# Altium PCB x-fly_v0.11a.PcbDoc (part 1 of 2)
Units mil, origin at the board's own origin, x right, y up, seen from the top; angles counter-clockwise.
Board outline 1417.32 x 1417.32 mil, 4 copper layers (L1_TOP, L2_GND, L3_POWER, L4_BOTTOM), stack 21.665 mil thick; 122 components, 92 nets, 493 pads, 97 vias.
Unrouted connection lines stored in the file: 100.
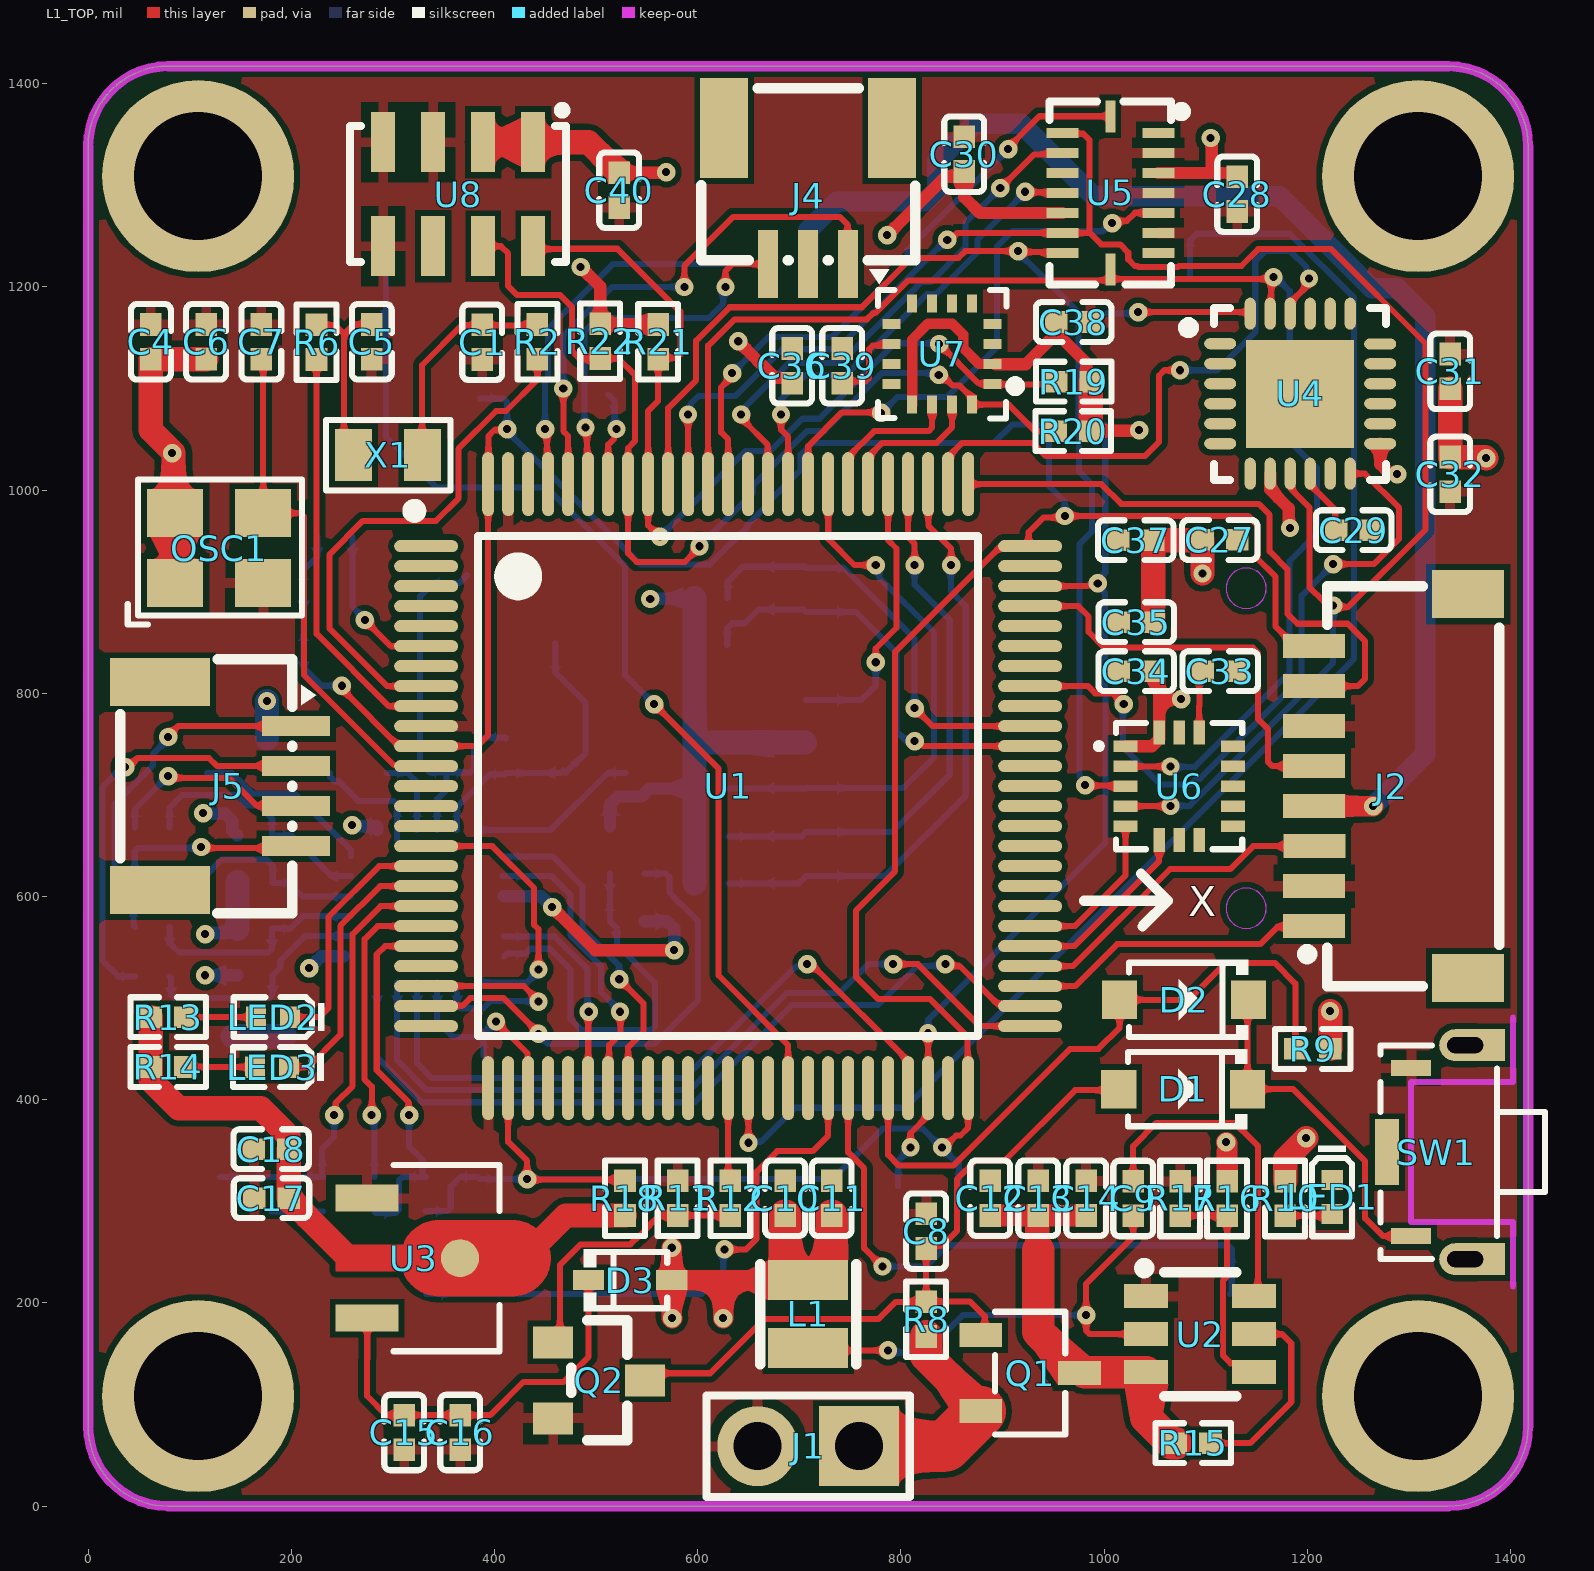
[diagram p0: L1_TOP view]
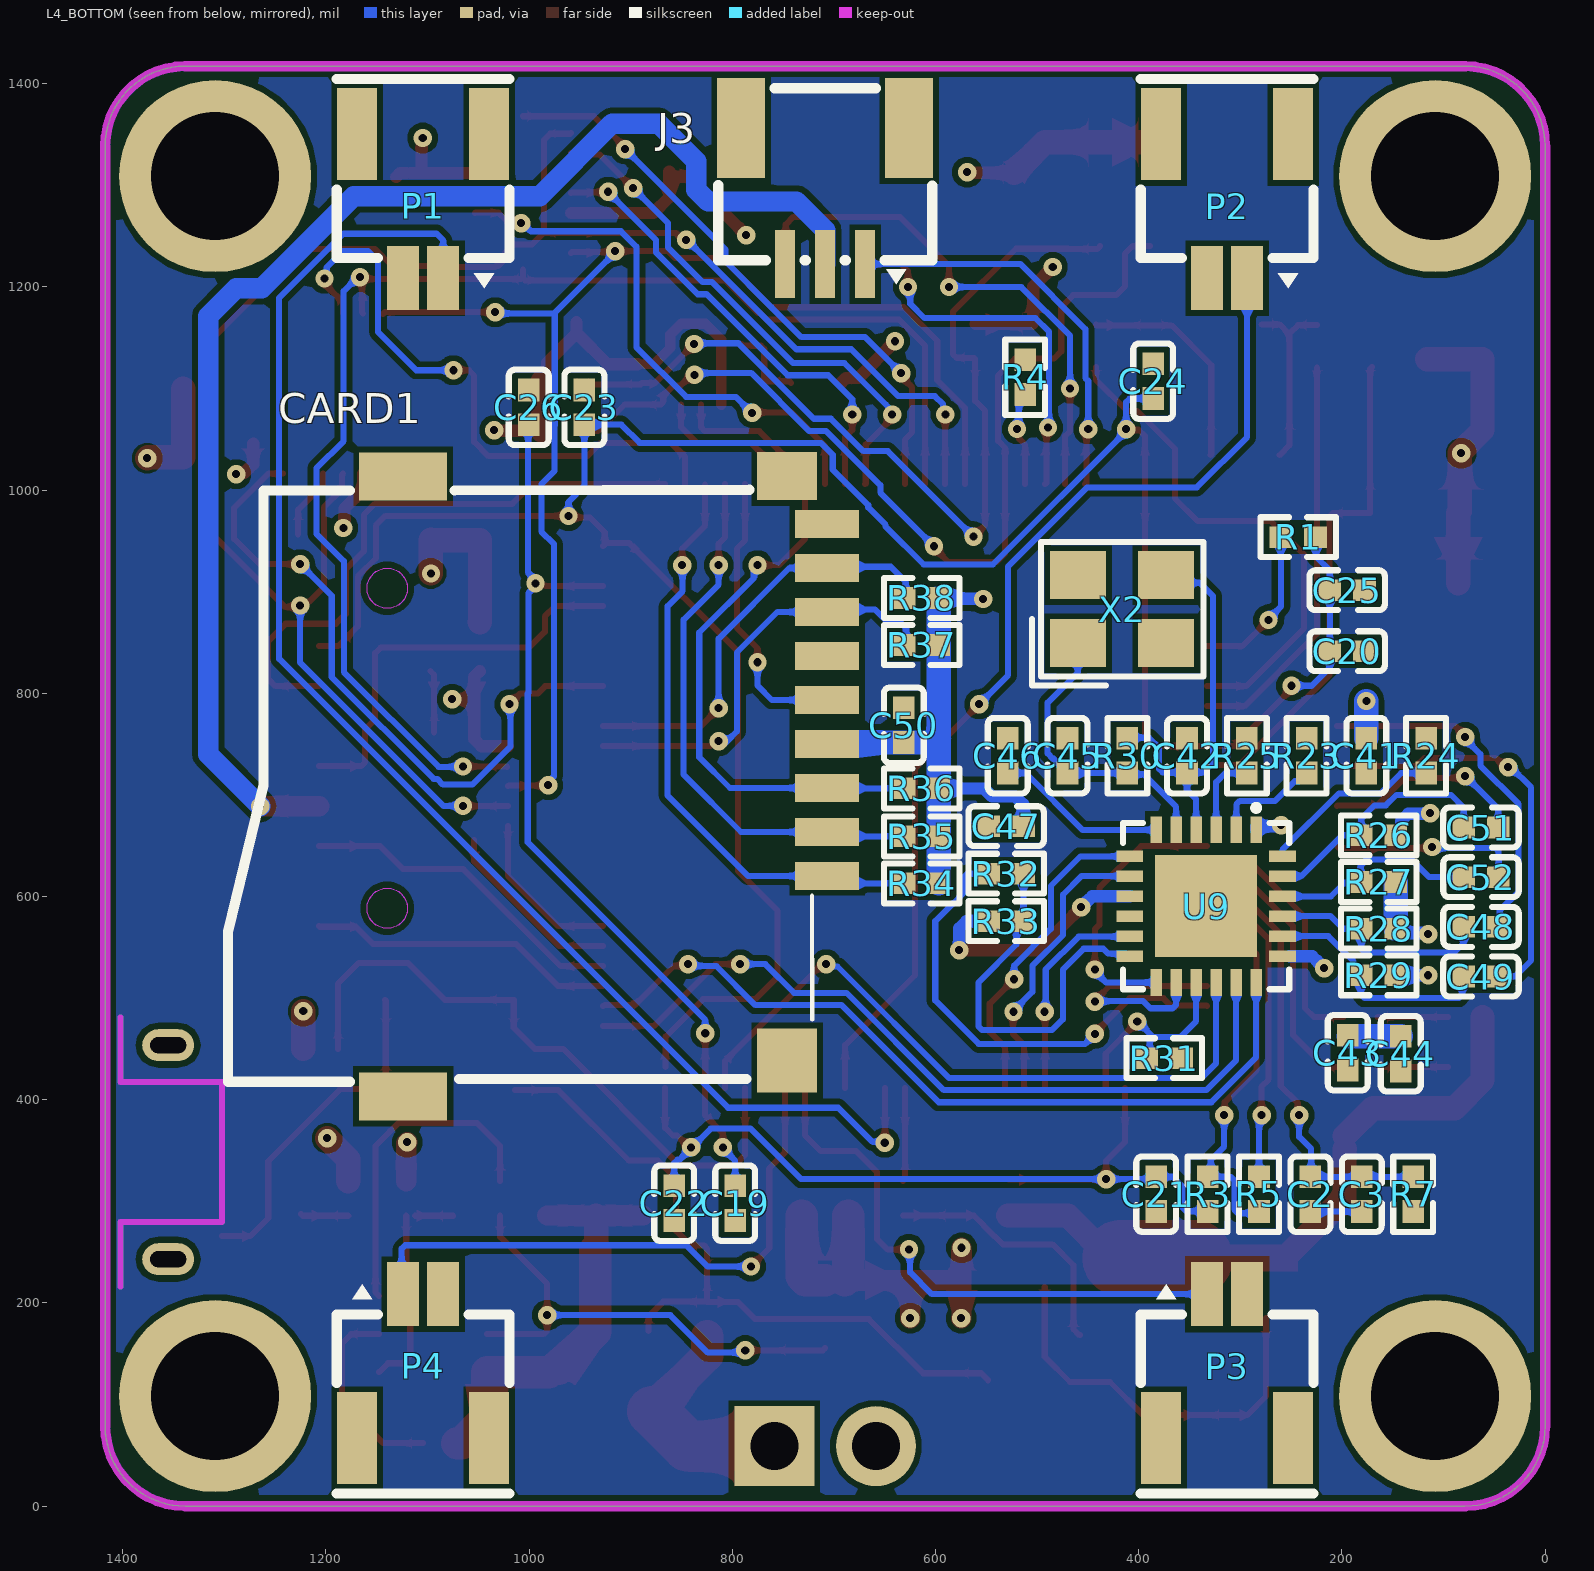
[diagram p1: L4_BOTTOM view, seen from below]
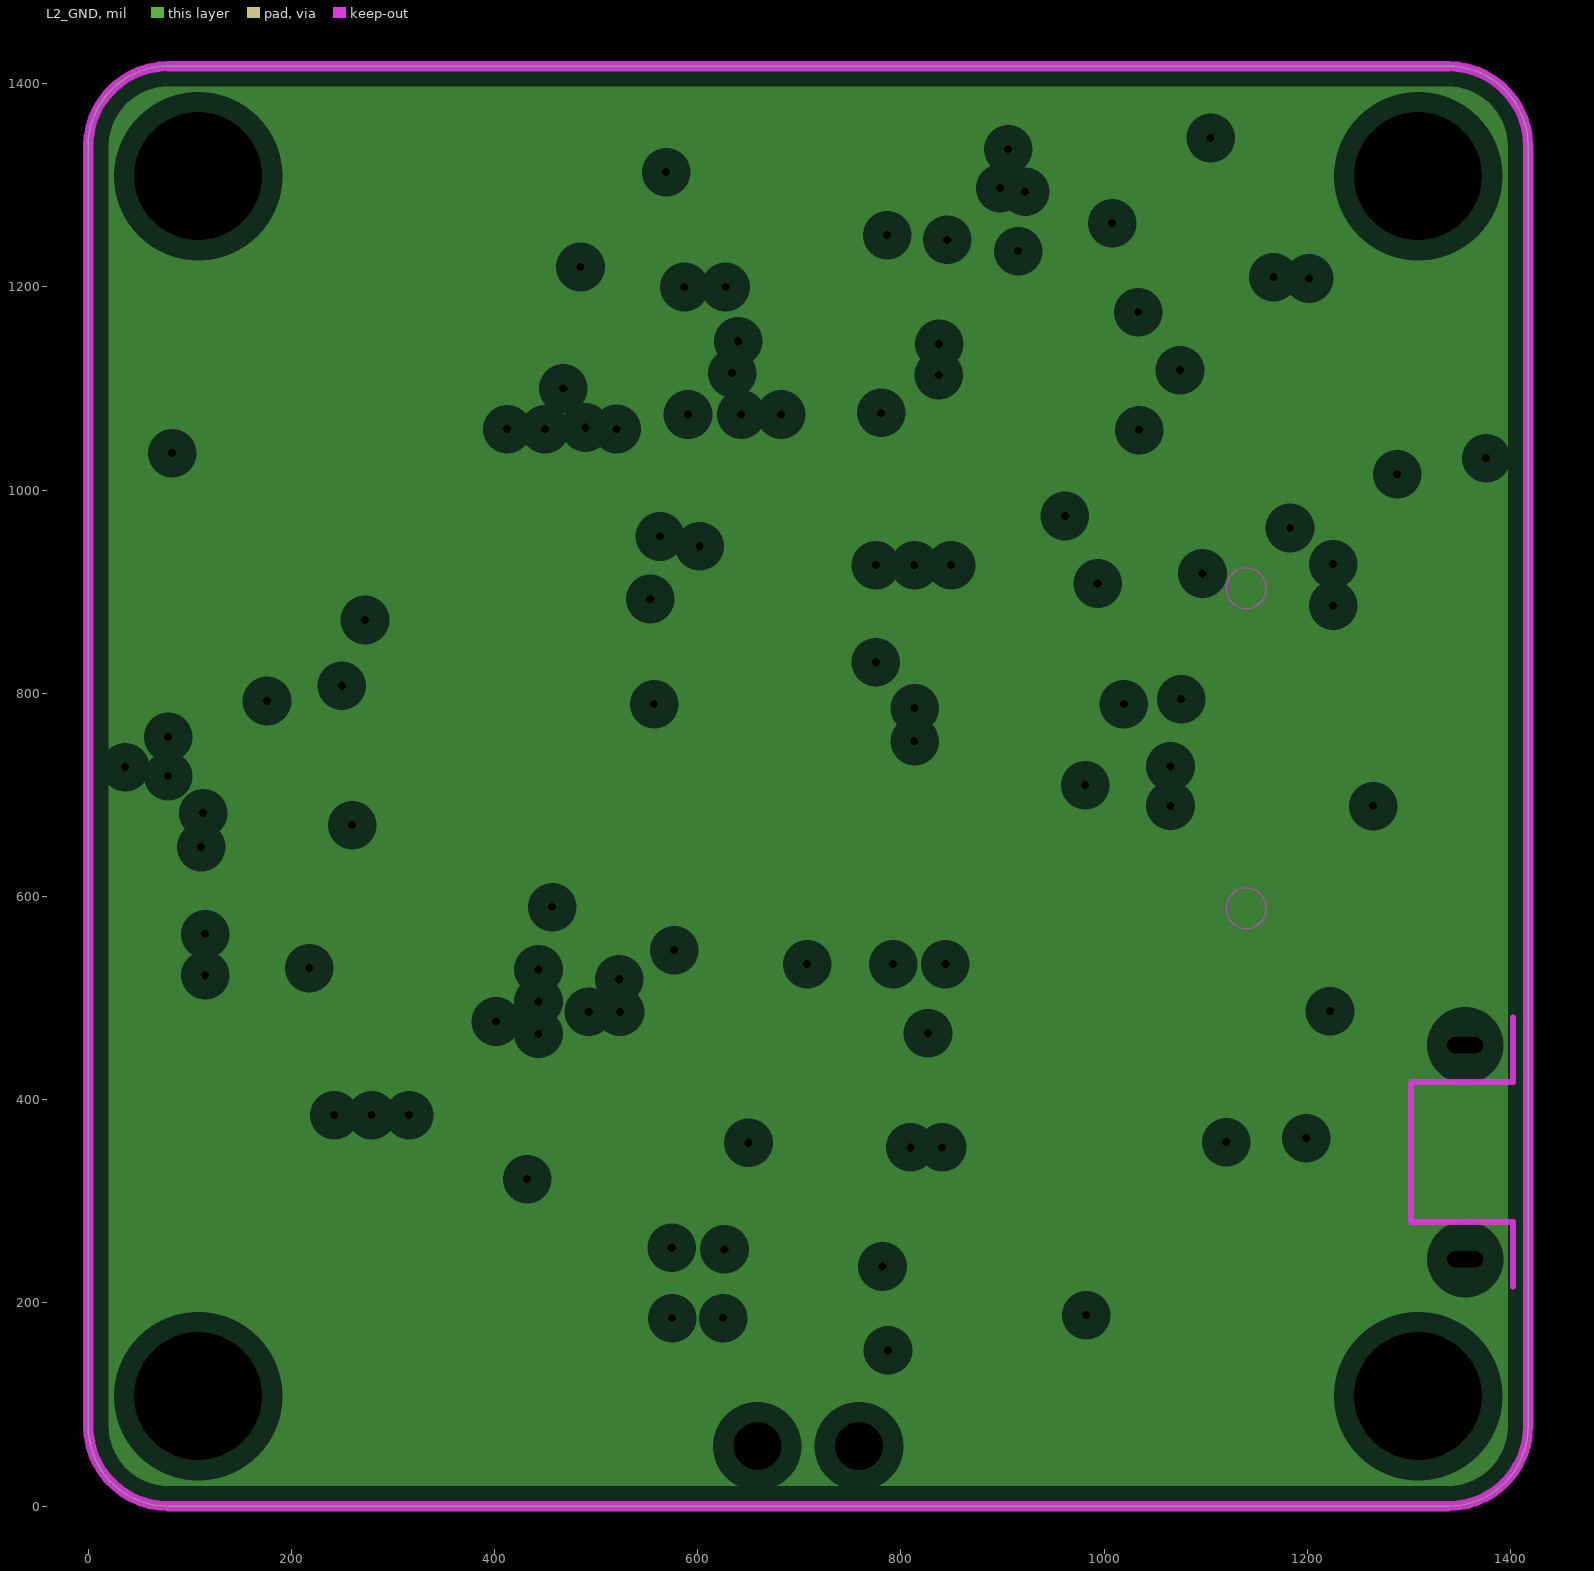
[diagram p2: L2_GND, clearances drawn from the general rule]
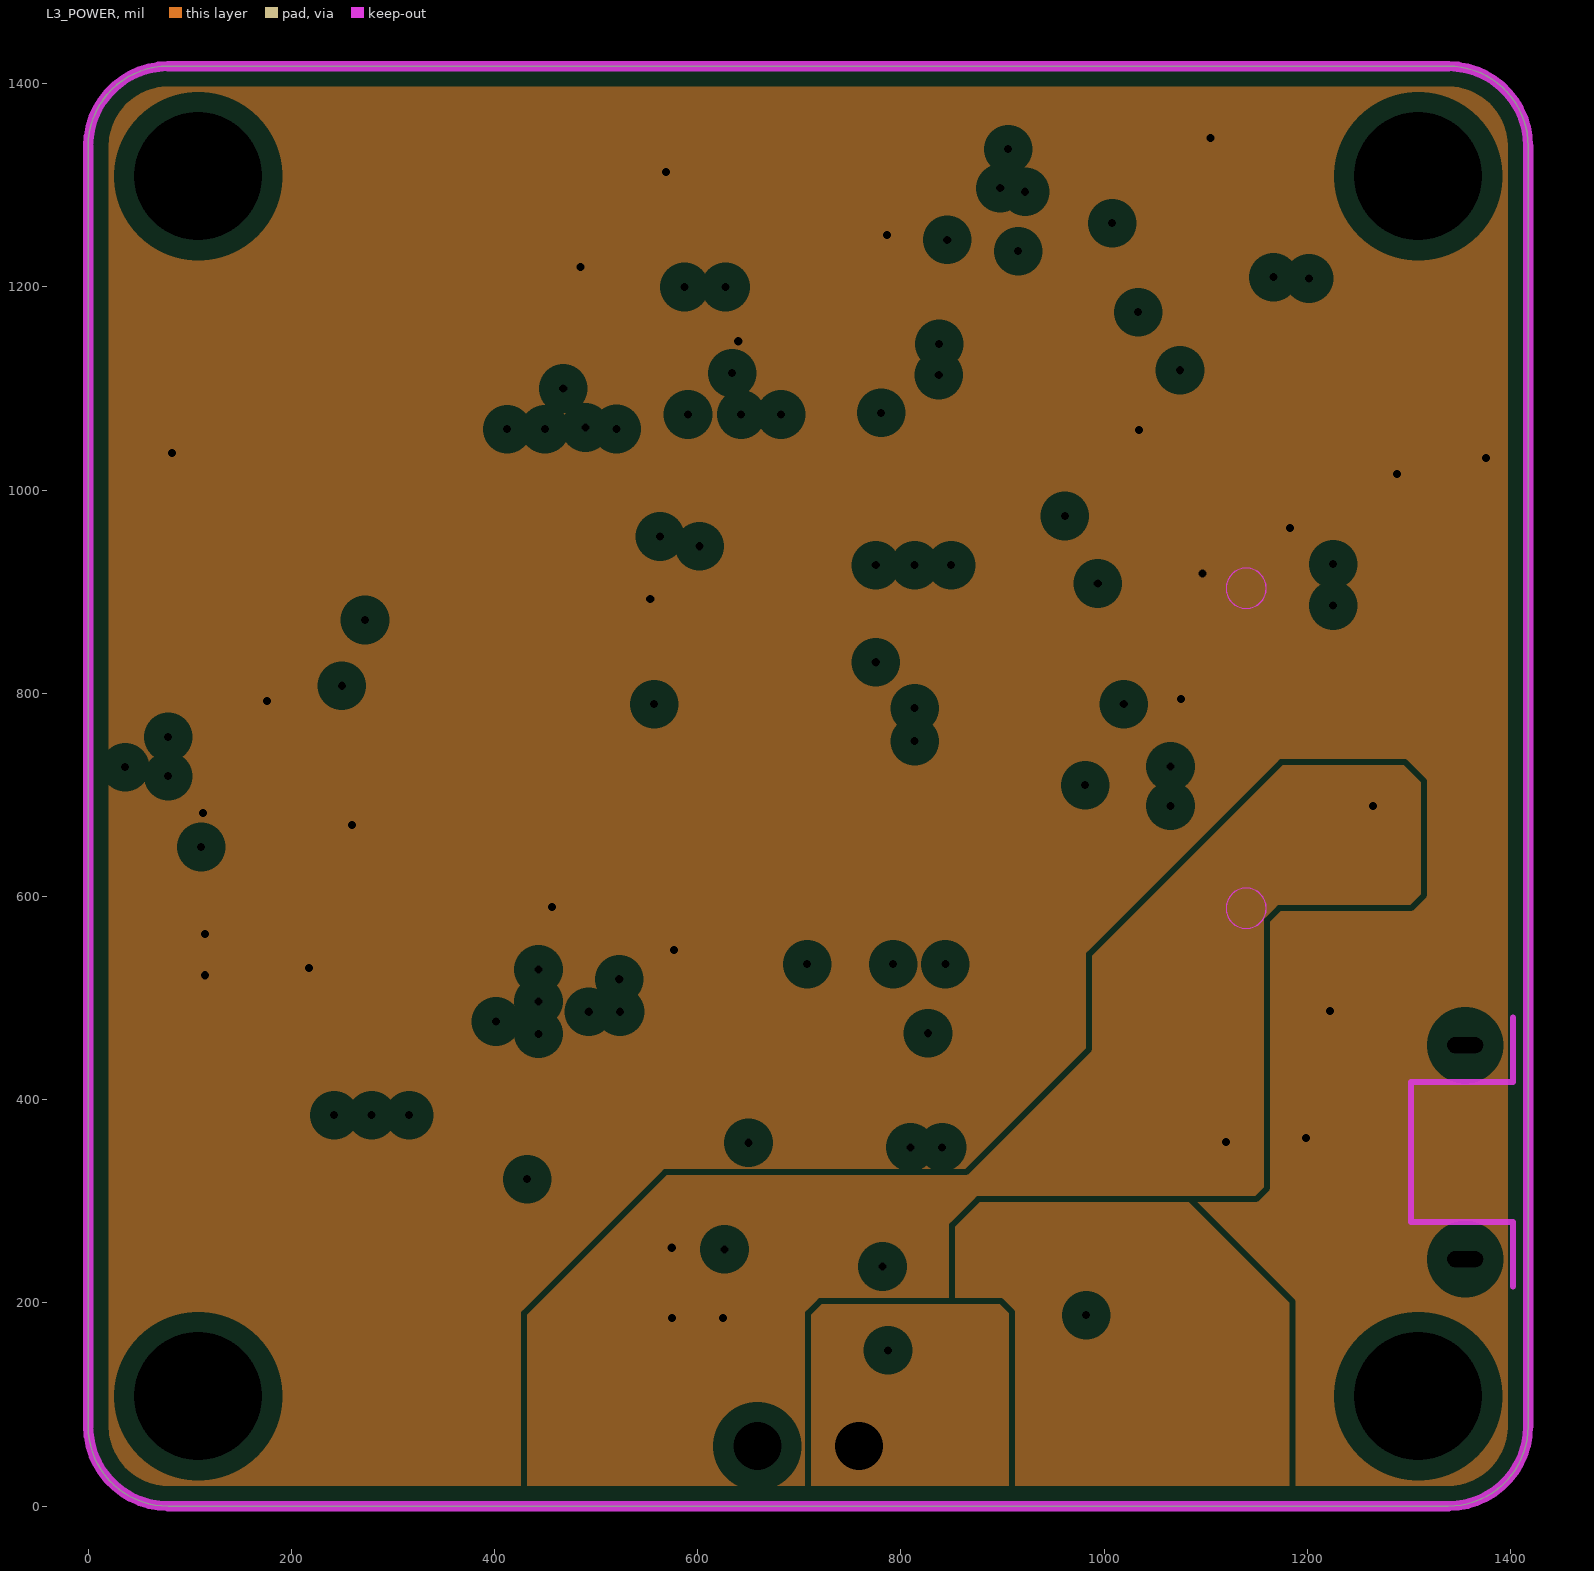
[diagram p3: L3_POWER, clearances drawn from the general rule]

## Layer stack, top to bottom
Top Solder: solder mask 0.4, Solder Resist, Dk 3.5
L1_TOP: signal copper 0.3543
Dielectric 2: prepreg 2.8, PP-006, Dk 4.1
L2_GND: plane copper 1.378
Dielectric 1: dielectric 12.6, FR-4, Dk 4.8
L3_POWER: plane copper 1.378, net 3V3
Dielectric 3: prepreg 2.8, PP-006, Dk 4.1
L4_BOTTOM: signal copper 0.3543
Bottom Solder: solder mask 0.4, Solder Resist, Dk 3.5

## Board outline
0,78.74 0,1338.58 cw(c78.74,1338.58) 78.74,1417.32 1338.58,1417.32 cw(c1338.58,1338.58) 1417.32,1338.58 1417.32,78.74 cw(c1338.58,78.74) 1338.58,0 78.74,0 cw(c78.74,78.74)

## Design rules (kind name [scope] priority, off if disabled: settings)
Clearance [All] p1: gap=5.91 ignorepadtopadclearanceinfootprint=TRUE
HoleSize HoleSize_1 [IsPad] p1: absolutevalues=TRUE maxlimit=141.73 minlimit=1 maxpercent=80.000 minpercent=20.000
HoleSize [All] p2: absolutevalues=TRUE maxlimit=100 minlimit=1 maxpercent=80.000 minpercent=20.000
MinimumSolderMaskSliver MaskSliver_DenseFoot [InComponent('CARD1') Or InComponent('U4') Or InComponent('U5') Or InComponent('U6') Or InComponent('U7')] p1: minsoldermaskwidth=0
MinimumSolderMaskSliver [All] p2: minsoldermaskwidth=3.94
PlaneClearance [All] p1: clearance=20
PlaneConnect [All] p1: planeconnectstyle=Relief reliefexpansion=20 reliefentries=4 reliefconductorwidth=10 reliefairgap=10
PolygonConnect [All] p1: connectstyle=Relief reliefconductorwidth=10 reliefentries=4 polygonreliefangle="90 Angle" airgapwidth=10
RoutingVias [All] p1: holewidth=11.81 width=23.62 viastyle="Through Hole" minholewidth=11.81 minwidth=23.62 maxholewidth=11.81 maxwidth=23.62
SilkToSolderMaskClearance SilkToSolderMaskClearance_1 [InComponent('J3') Or InComponent('J4') Or InComponent('J5')] p1: minsilkscreentomaskgap=0 clearancetoexposedcopper=TRUE
SilkToSolderMaskClearance [IsPad] p2: minsilkscreentomaskgap=1.97 clearancetoexposedcopper=TRUE
SolderMaskExpansion [All] p1: expansion=4 istentingtop=FALSE
SupplyNets "Schematic Supply Nets_2" [InNet('+BAT_3S')] p1: voltage=0.000
SupplyNets "Schematic Supply Nets_1" [InNet('GND')] p2: voltage=0.000
SupplyNets "Schematic Supply Nets" [InNet('VDD_MCU')] p3: voltage=0.000
UnRoutedNet [InNet('No Net')] p1:
Width 12V [InNetClass('12V')] p1: maxlimit=60 minlimit=20 preferedwidth=50 minimp=50.000000 maximp=50.000000 favimp=50.000000
Width 5V [InNetClass('5V')] p2: maxlimit=40 minlimit=20 preferedwidth=32 minimp=50.000000 maximp=50.000000 favimp=50.000000
Width 3.3V [InNetClass('3.3V')] p3: maxlimit=32 minlimit=10 preferedwidth=24 minimp=50.000000 maximp=50.000000 favimp=50.000000
Width [All] p4: maxlimit=10 minlimit=6 preferedwidth=6 minimp=50.000000 maximp=50.000000 favimp=50.000000
24 further rules are at their usual default settings.

## Classes and differential pairs
net class 12V: +BAT_3S VSYS
net class 5V: 5V
net class 3.3V: 3V3
component class Sheet3: C41 C42 C43 C44 C45 C46 C47 C48 C49 C50 C51 C52 CARD1 J5 R23 R24 R25 R26 R27 R28 R29 R30 R31 R32 R33 R34 R35 R36 R37 R38 U9 X2
component class Sheet2: C27 C28 C29 C30 C31 C32 C33 C34 C35 C36 C37 C38 C39 C40 R19 R20 R21 R22 U4 U5 U6 U7 U8
component class Sheet1: C1 C2 C3 C4 C5 C6 C7 C8 C9 C10 C11 C12 C13 C14 C15 C16 C17 C18 C19 C20 C21 C22 C23 C24 C25 C26 D1 D2 D3 J1 J2 J3 J4 L1 LED1 LED2 LED3 OSC1 P1 P2 P3 P4 Q1 Q2 R1 R2 R3 R4 R5 R6 R7 R8 R9 R10 R11 R12 R13 R14 R15 R16 R17 R18 SW1 U1 U2 U3 X1

## Components (designator, comment, footprint, x,y, rotation, side; value= is the part's Value field where it differs from the comment)
C1 "0402-Cap-5.1pF" 0402-Cap 387.84,1145.67 r90 top
C2 "0402-Cap-100nF" 0402-Cap 231.11,307.09 r270 bottom
C3 "0402-Cap-10uF" 0402-Cap 180.52,307.09 r270 bottom
C4 "0402-Cap-100nF" 0402-Cap 61.71,1146.07 r270 top
C5 "0402-Cap-5.1pF" 0402-Cap 279.13,1146.07 r90 top
C6 "0402-Cap-10uF" 0402-Cap 116.07,1146.07 r270 top
C7 "0402-Cap-15pF" 0402-Cap 170.42,1146.07 r270 top
C8 "0402-Cap-4.7uF" 0402-Cap 824.79,270.67 r270 top
C9 "0402-Cap-0.1uF" 0402-Cap 1028.54,302.87 r270 top
C10 "0402-Cap-22uF" 0402-Cap 685.93,303.13 r90 top
C11 "0402-Cap-22uF" 0402-Cap 731.79,303.13 r90 top
C12 "0402-Cap-10uF" 0402-Cap 887.8,303.15 r270 top
C13 "0402-Cap-10uF" 0402-Cap 935.04,303.15 r270 top
C14 "0402-Cap-0.1uF" 0402-Cap 982.28,303.15 r270 top
C15 "0402-Cap-22uF" 0402-Cap 311.02,72.55 r270 top
C16 "0402-Cap-100nF" 0402-Cap 366.14,72.55 r270 top
C17 "0402-Cap-100nF" 0402-Cap 180.44,303.15 r180 top
C18 "0402-Cap-22uF" 0402-Cap 180.12,351.38 r180 top
C19 "0402-Cap-2.2uF" 0402-Cap 797.24,298.23 r90 bottom locked
C20 "0402-Cap-4.7uF" 0402-Cap 194.88,841.54 r0 bottom locked
C21 "0402-Cap-100nF" 0402-Cap 382.87,307.09 r90 bottom
C22 "0402-Cap-100nF" 0402-Cap 857.28,298.23 r90 bottom locked
C23 "0402-Cap-100nF" 0402-Cap 945.64,1081.5 r270 bottom locked
C24 "0402-Cap-100nF" 0402-Cap 385.83,1107.28 r270 bottom
C25 "0402-Cap-100nF" 0402-Cap 194.88,901.57 r0 bottom locked
C26 "0402-Cap-2.2uF" 0402-Cap 1000.42,1081.5 r270 bottom locked
C27 "0402-Cap-10nF" 0402-Cap 1113.76,951.05 r0 top
C28 "0402-Cap-100nF" 0402-Cap 1130.91,1291.34 r90 top
C29 "0402-Cap-0.47uF" 0402-Cap 1245.47,960.63 r0 top
C30 "0402-Cap-100nF" 0402-Cap 862.2,1330.71 r270 top
C31 "0402-Cap-2.2uF" 0402-Cap 1340.55,1116.93 r270 top
C32 "0402-Cap-0.1uF" 0402-Cap 1340.55,1015.55 r90 top
C33 "0402-Cap-0.1uF" 0402-Cap 1114.17,821.85 r0 top
C34 "0402-Cap-0.1uF" 0402-Cap 1031.5,821.85 r0 top
C35 "0402-Cap-2.2uF" 0402-Cap 1031.5,870.08 r0 top
C36 "0402-Cap-0.1uF" 0402-Cap 692.91,1122.44 r270 top
C37 "0402-Cap-10nF" 0402-Cap 1030.98,950.79 r0 top
C38 "0402-Cap-0.1uF" 0402-Cap 969.87,1165.51 r0 top
C39 "0402-Cap-4.7uF" 0402-Cap 742.13,1122.44 r90 top
C40 "0402-Cap-0.1uF" 0402-Cap 522.64,1295.28 r270 top
C41 "0402-Cap-0.1uF" 0402-Cap 176.03,738.67 r270 bottom
C42 "0402-Cap-18pF" 0402-Cap 352.5,738.67 r90 bottom
C43 "0402-Cap-0.1uF" 0402-Cap 194.32,446.33 r270 bottom locked
C44 "0402-Cap-0.1uF" 0402-Cap 142.16,445.35 r90 bottom locked
C45 "0402-Cap-18pF" 0402-Cap 470.14,738.67 r270 bottom
C46 "0402-Cap-10uF" 0402-Cap 528.97,738.67 r90 bottom
C47 "0402-Cap-0.1uF" 0402-Cap 530.51,669.29 r0 bottom
C48 "0402-Cap-0.1uF" 0402-Cap 63.19,570.21 r0 bottom
C49 "0402-Cap-0.1uF" 0402-Cap 63.19,521.33 r0 bottom
C50 "0402-Cap-0.1uF" 0402-Cap 631.31,768.67 r270 bottom
C51 "0402-Cap-0.1uF" 0402-Cap 63.19,667.98 r0 bottom
C52 "0402-Cap-0.1uF" 0402-Cap 63.19,619.09 r0 bottom
CARD1 "TF" TF 915.35,708.66 r270 bottom locked
D1 "1N4148W" 1N4148W 1077.76,410.43 r0 top
D2 "1N4148W" 1N4148W 1078.58,498.39 r0 top
D3 "B5819WS" B5819WS 533.46,222.44 r180 top
J1 "XH2.50_2PIN-CZ" XH2.50_2PIN-CZ 708.66,59.06 r180 top locked
J2 "PM1.00-1-8PY" PM1.00-1-8PY 1282.48,708.66 r90 top locked
J3 "zx-sh1.0-3pwt" PM1.00-1-3PY 708.66,1289.37 r0 bottom locked
J4 "zx-sh1.0-3pwt" PM1.00-1-3PY 708.66,1289.37 r180 top locked
J5 "PM1.00-1-4PY" PM1.00-1-4PY 137.8,708.66 r270 top locked
L1 "2512-IND-3.3uH" 2512-IND 708.66,188.98 r270 top value=3.3uH
LED1 "LED-0402-BLUE" LED-0402-BLUE 1224.41,304.13 r270 top
LED2 "LED-0402-GREEN" LED-0402-GREEN 181.72,481.3 r180 top
LED3 "LED-0402-RED" LED-0402-RED 181.1,432.09 r180 top
OSC1 "HS_25M hz" YXC_HS_25M_3225 128.94,942.91 r0 top
P1 "PM1.00-1-2PY" PM1.00-1-2PY 1104.33,1279.53 r0 bottom locked
P2 "PM1.00-1-2PY" PM1.00-1-2PY 312.99,1279.53 r0 bottom locked
P3 "PM1.00-1-2PY" PM1.00-1-2PY 312.99,137.8 r180 bottom locked
P4 "PM1.00-1-2PY" PM1.00-1-2PY 1104.33,137.8 r180 bottom locked
Q1 "BLM3401" BLM3401 927.17,130.91 r180 top locked
Q2 "2N7002" 2N7002 502.95,123.91 r180 top
R1 "0402-Res-0Ω" 0402-Res 243.11,953.74 r0 bottom locked
R2 "0402-Res-0Ω" 0402-Res 442.18,1146.06 r270 top
R3 "0402-Res-0Ω" 0402-Res 332.27,307.08 r90 bottom
R4 "0402-Res-0Ω" 0402-Res 511.81,1111.22 r90 bottom locked
R5 "0402-Res-0Ω" 0402-Res 281.68,307.08 r270 bottom
R6 "0402-Res-0Ω" 0402-Res 224.76,1145.67 r270 top
R7 "0402-Res-0Ω" 0402-Res 129.92,307.08 r90 bottom
R8 "0402-Res-47kΩ" 0402-Res 824.8,184.06 r270 top
R9 "0402-Res-10kΩ" 0402-Res 1205.3,450.06 r0 top
R10 "0402-Res-270Ω" 0402-Res 1178.06,302.86 r270 top
R11 "0402-Res-10kΩ" 0402-Res 580.2,303.14 r270 top
R12 "0402-Res-10kΩ" 0402-Res 632.06,303.14 r270 top
R13 "0402-Res-510Ω" 0402-Res 78.74,481.3 r0 top
R14 "0402-Res-510Ω" 0402-Res 78.74,432.22 r0 top
R15 "0402-Res-10kΩ" 0402-Res 1087.6,62.01 r180 top
R16 "0402-Res-54.9kΩ" 0402-Res 1121.02,302.86 r270 top
R17 "0402-Res-10kΩ" 0402-Res 1074.8,302.86 r270 top
R18 "0402-Res-0Ω" 0402-Res 528.35,303.14 r270 top
R19 "0402-Res-4.7KΩ" 0402-Res 969.88,1106.78 r0 top
R20 "0402-Res-4.7KΩ" 0402-Res 969.49,1058.07 r0 top
R21 "0402-Res-10KΩ" 0402-Res 561.02,1146.06 r90 top locked
R22 "0402-Res-10KΩ" 0402-Res 503.94,1146.65 r270 top
R23 "0402-Res-10kΩ" 0402-Res 234.83,738.68 r90 bottom
R24 "0402-Res-12.1kΩ" 0402-Res 117.19,738.68 r270 bottom
R25 "0402-Res-10kΩ" 0402-Res 293.66,738.68 r90 bottom
R26 "0402-Res-49.9Ω" 0402-Res 163.98,660.3 r0 bottom locked
R27 "0402-Res-49.9Ω" 0402-Res 163.98,614.37 r0 bottom locked
R28 "0402-Res-49.9Ω" 0402-Res 163.98,568.44 r0 bottom locked
R29 "0402-Res-49.9Ω" 0402-Res 163.98,522.51 r0 bottom locked
R30 "0402-Res-1MΩ" 0402-Res 411.31,738.68 r90 bottom
R31 "0402-Res-10kΩ" 0402-Res 375,440.94 r0 bottom
R32 "0402-Res-33Ω" 0402-Res 530.5,622.53 r0 bottom
R33 "0402-Res-1.5kΩ" 0402-Res 530.51,575.79 r0 bottom
R34 "0402-Res-47kΩ" 0402-Res 613.78,612.99 r180 bottom locked
R35 "0402-Res-47kΩ" 0402-Res 613.78,659.25 r180 bottom locked
R36 "0402-Res-47kΩ" 0402-Res 613.78,706.5 r180 bottom
R37 "0402-Res-47kΩ" 0402-Res 613.78,847.64 r180 bottom
R38 "0402-Res-47kΩ" 0402-Res 613.78,893.9 r180 bottom
SW1 "BUTTON-MINI" button-mini 1326.77,348.43 r270 top locked
U1 "STM32H743VIT6" STM32H743VIT6 629.92,708.66 r270 top locked
U2 "TPS563201DDCR" TPS563201DDCR 1094.49,169.29 r180 top locked
U3 "AMS1117-SOT-89" AMS1117-SOT-89 328,244.1 r180 top locked
U4 "ICM-20689" ICM-20689 1192.92,1094.98 r0 top locked
U5 "BMI088" BMI088 1006.89,1289.37 r180 top locked
U6 "ICM-20602" ICM-20602 1073.82,708.66 r270 top locked
U7 "IST8310" IST8310 840.55,1133.86 r90 top locked
U8 "MS5611" MS5611 364.17,1291.34 r180 top
U9 "LAN8720A" LAN8720A 333.66,590.55 r0 bottom
X1 "32.768k hz" 32.768KHZ_2012 295.28,1034.45 r0 top
X2 "YXC_NS_25M_3225" YXC_NS_25M_3225 416.34,882.87 r180 bottom locked

## Footprints (in the part's own frame and the unit in brackets; to place one, negate y for a bottom-side part, rotate by r counter-clockwise, add the part's x,y. Pads: shape width x height; smd on the part's side, far side on the other; paste and mask are expansions set on the pad)
1N4148W [mm] "SOD-123_L2.7-W1.6-LS3.7-FD"
  rect 0.88x0.96 smd: 1(-1.61,0) 2(1.61,0)
  silkscreen extent -1.38,-1 1.6,1
2N7002 [mm] "SOT-23_L2.9-W1.3-P1.90-LS2.4-BR"
  rect 1x0.8 smd: 1(1.15,-0.95) 2(1.15,0.95) 3(-1.15,0)
  silkscreen extent -0.7,-1.5 0.7,1.5
32.768KHZ_2012 [mm] "FC-12M_L2.0-W1.2"
  rect 0.925x1.3 smd paste+0.051: 1(-0.863,0) 2(0.863,0)
  silkscreen extent -1.55,-0.88 1.55,0.88
0402-Cap [mm]
  rect 0.566x0.54 smd paste-100 mask+0.051: 1(-0.433,0) 2(0.433,0)
  silkscreen extent -0.94,-0.5 0.94,0.5
0402-Res [mm]
  rect 0.566x0.54 smd paste-100 mask+0.051: 1(-0.433,0) 2(0.433,0)
  silkscreen extent -0.94,-0.5 0.94,0.5
2512-IND [mm] "IND-SMD_L2.5-W2.0_YHNR2512"
  rect 1x2 smd: 1(-0.85,0) 2(0.85,0)
  silkscreen extent -1.25,-1.2 1.25,1.2
AMS1117-SOT-89 [mm] "SOT-89-3_L4.5-W2.5-P1.50-LS4.2-BR"
  rect 1.575x0.672 smd paste+0 mask+0.051: 1(1.356,-1.5) 3(1.356,1.5)
  round 0.95 smd: 2(-0.966,0)
  L1_TOP region: -2.283,0.95 -0.429,0.95 -0.384,0.949 -0.34,0.946 -0.296,0.94 -0.252,0.933 -0.208,0.924 -0.165,0.912 -0.123,0.899 -0.081,0.884 -0.04,0.866 0,0.847 0.04,0.826 0.078,0.803 0.115,0.779 0.151,0.752 0.185,0.724 0.219,0.695 0.251,0.664 0.281,0.631 0.31,0.597 0.337,0.562 0.362,0.525 0.386,0.488 0.408,0.449 0.428,0.409 0.447,0.33 2.144,0.33 2.144,-0.33 0.447,-0.33 0.428,-0.409 0.408,-0.449 0.386,-0.488 0.362,-0.526 0.337,-0.562 0.31,-0.597 0.281,-0.631 0.251,-0.664 0.219,-0.695 0.185,-0.725 0.151,-0.753 0.115,-0.779 0.078,-0.804 0.04,-0.827 0,-0.848 -0.04,-0.867 -0.081,-0.884 -0.123,-0.899 -0.165,-0.913 -0.208,-0.924 -0.252,-0.934 -0.296,-0.941 -0.34,-0.946 -0.384,-0.949 -0.429,-0.95 -2.283,-0.95 -2.328,-0.949 -2.372,-0.946 -2.416,-0.941 -2.46,-0.934 -2.504,-0.924 -2.547,-0.913 -2.589,-0.899 -2.631,-0.884 -2.672,-0.867 -2.713,-0.848 -2.752,-0.827 -2.79,-0.804 -2.827,-0.779 -2.863,-0.753 -2.898,-0.725 -2.931,-0.695 -2.963,-0.664 -2.993,-0.631 -3.022,-0.597 -3.049,-0.562 -3.075,-0.526 -3.098,-0.488 -3.12,-0.449 -3.141,-0.409 -3.159,-0.369 -3.175,-0.327 -3.189,-0.285 -3.202,-0.242 -3.212,-0.199 -3.22,-0.155 -3.227,-0.111 -3.231,-0.067 -3.233,-0.022 -3.233,0.022 -3.231,0.067 -3.227,0.111 -3.22,0.155 -3.212,0.199 -3.202,0.242 -3.189,0.285 -3.175,0.327 -3.159,0.369 -3.141,0.409 -3.12,0.449 -3.098,0.488 -3.075,0.525 -3.049,0.562 -3.022,0.597 -2.993,0.631 -2.963,0.664 -2.931,0.695 -2.898,0.724 -2.863,0.752 -2.827,0.779 -2.79,0.803 -2.752,0.826 -2.713,0.847 -2.672,0.866 -2.631,0.884 -2.589,0.899 -2.547,0.912 -2.504,0.924 -2.46,0.933 -2.416,0.94 -2.372,0.946 -2.328,0.949 -2.283,0.95
  silkscreen extent -1.95,-2.33 0.7,2.33
B5819WS [mm] "SOD-323_L1.7-W1.3-LS2.5-FD"
  rect 0.78x0.5 smd: 1(-1.04,0) 2(1.04,0)
  silkscreen extent -0.93,-0.78 1.15,0.78
BLM3401 [mm] "SOT-23-3_L2.9-W1.6-P1.90-LS2.8-BR"
  rect 1.07x0.6 smd paste+0 mask+0.051: 1(1.235,-0.95) 2(1.235,0.95) 3(-1.235,0)
  silkscreen extent -0.88,-1.54 0.88,1.54
BMI088 [mm]
  rect 0.8x0.25 smd paste+0.051: 1(-1.177,-1.581) 2(-1.177,-1.081) 3(-1.177,-0.581) 4(-1.177,-0.081) 5(-1.177,0.419) 6(-1.177,0.919) 7(-1.177,1.419) 9(1.223,1.419) 10(1.223,0.919) 11(1.223,0.419) 12(1.223,-0.081) 13(1.223,-0.581) 14(1.223,-1.081) 15(1.223,-1.581)
  rect 0.25x0.8 smd paste+0.051: 8(0.023,1.832) 16(0.023,-1.998)
  silkscreen extent -1.87,-2.37 1.55,2.2
button-mini [mm]
  rect 0.4x1 smd paste-100 mask+0.051: 1(-2.1,-0.625) 2(2.1,-0.625)
  rect 1.65x0.6 smd paste-100 mask+0.051: 3(0,-1.225)
  oval 0.8x1.3 hole 0.4 slot 0.9 at 90 deg: 4(-2.675,0.725) 4(2.675,0.725)
  rect 0.8x1 smd paste-100 mask+0.051: 4(-2.675,1.225) 4(2.675,1.225)
  Keep-Out Layer lines w0.15: 3.361,1.915 1.75,1.915 1.75,1.143 1.75,-0.625 -1.75,-0.625 -1.75,1.143 -1.75,1.788 -1.75,1.915 -3.37,1.915
  silkscreen extent -2.67,-1.4 2.67,2.73
ICM-20602 [mm] "LGA-16_L3.0-W3.0-P0.50-BL"
  rect 0.28x0.6 smd paste+0.051: 1(-1,-1.343) 2(-0.5,-1.343) 3(0,-1.343) 4(0.5,-1.343) 5(1,-1.343) 9(1,1.343) 10(0.5,1.343) 11(0,1.343) 12(-0.5,1.343) 13(-1,1.343)
  rect 0.6x0.28 smd paste+0.051: 6(1.343,-0.5) 7(1.343,0) 8(1.343,0.5) 14(-1.343,0.5) 15(-1.343,0) 16(-1.343,-0.5)
  silkscreen extent -1.58,-2.08 1.58,1.58
ICM-20689 [mm] "QFN-24_L4.0-W4.0-P0.50-TL-EP2.6"
  oval 0.8x0.28 smd paste-100 mask+0.051: 1(-2,1.25) 2(-2,0.75) 3(-2,0.25) 4(-2,-0.25) 5(-2,-0.75) 6(-2,-1.25) 13(2,-1.25) 14(2,-0.75) 15(2,-0.25) 16(2,0.25) 17(2,0.75) 18(2,1.242)
  oval 0.28x0.8 smd paste-100 mask+0.051: 7(-1.25,-2) 8(-0.75,-2) 9(-0.25,-2) 10(0.25,-2) 11(0.75,-2) 12(1.25,-2) 19(1.25,2) 20(0.75,2) 21(0.25,2) 22(-0.25,2) 23(-0.75,2) 24(-1.25,2)
  rect 2.7x2.7 smd paste-100 mask+0.051: 25(0,-0.013)
  silkscreen extent -3.05,-2.16 2.15,2.14
IST8310 [mm] "LGA-16_L3.0-W3.0-P0.50-BL_SQ"
  rect 0.25x0.45 smd paste+0.051: 1(-0.75,-1.263) 2(-0.25,-1.263) 3(0.25,-1.263) 4(0.75,-1.263) 9(0.75,1.263) 10(0.25,1.263) 11(-0.25,1.263) 12(-0.75,1.263)
  rect 0.45x0.25 smd paste+0.051: 5(1.263,-0.75) 6(1.263,-0.25) 7(1.263,0.25) 8(1.263,0.75) 13(-1.263,0.75) 14(-1.263,0.25) 15(-1.263,-0.25) 16(-1.263,-0.75)
  silkscreen extent -1.61,-1.95 1.61,1.6
LAN8720A [mm] "QFN-24_L4.0-W4.0-P0.50-BL-EP2.6"
  rect 0.28x0.665 smd paste-100 mask+0.05: 1(-1.25,-1.908) 2(-0.75,-1.908) 3(-0.25,-1.908) 4(0.25,-1.908) 5(0.75,-1.908) 6(1.25,-1.908) 13(1.25,1.908) 14(0.75,1.908) 15(0.25,1.908) 16(-0.25,1.908) 17(-0.75,1.908) 18(-1.25,1.908)
  rect 0.665x0.28 smd paste-100 mask+0.05: 7(1.908,-1.25) 8(1.908,-0.75) 9(1.908,-0.25) 10(1.908,0.25) 11(1.908,0.75) 12(1.908,1.25) 19(-1.908,1.25) 20(-1.908,0.75) 21(-1.908,0.25) 22(-1.908,-0.25) 23(-1.908,-0.75) 24(-1.908,-1.25)
  rect 2.55x2.55 smd paste-100 mask+0.05: 25(0,0)
  silkscreen extent -2.08,-2.53 2.08,2.08
LED-0402-BLUE [mm]
  rect 0.5x0.54 smd paste+0 mask+0.051: 1(0.425,0) 2(-0.425,0)
  silkscreen extent -1.28,-0.5 0.98,0.5
LED-0402-GREEN [mm]
  rect 0.5x0.54 smd: 1(-0.425,0) 2(0.425,0)
  silkscreen extent -1.28,-0.5 0.98,0.5
LED-0402-RED [mm]
  rect 0.5x0.54 smd: 1(-0.425,0) 2(0.425,0)
  silkscreen extent -1.28,-0.5 0.98,0.5
MS5611 [mm] "SENSORS-SMD_MS5611-01BA03"
  rect 0.6x1.5 smd paste+0.051: 1(-1.875,-1.3) 2(-0.625,-1.3) 3(0.625,-1.3) 4(1.875,-1.3) 5(1.875,1.3) 6(0.625,1.3) 7(-0.625,1.3) 8(-1.875,1.3)
  silkscreen extent -2.7,-2.18 2.7,1.7
PM1.00-1-2PY [mm] "CONN-SMD_2P-P1.00_HX-1.0-2P-WT"
  rect 0.8x1.6 smd paste+0 mask+0.05: 1(-0.5,1.8) 2(0.5,1.8)
  rect 1x2.3 smd paste+0 mask+0.05: 3(1.65,-1.8) 4(-1.65,-1.8)
  silkscreen extent -2.16,-3.18 2.16,2.05
PM1.00-1-3PY [mm] "CONN-SMD_3P-P1.00_MEGASTAR_ZX-SH1.0-3PWT"
  rect 0.5x1.7 smd paste+0 mask+0.05: 1(-1,1.7) 2(0,1.7) 3(1,1.7)
  rect 1.2x2.5 smd paste+0 mask+0.05: 4(-2.1,-1.7) 5(2.1,-1.7)
  silkscreen extent -2.68,-2.7 2.68,2.21
PM1.00-1-4PY [mm] "CONN-SMD_4P-P1.00_MEGASTAR_ZX-SH1.0-4PWT"
  rect 0.5x1.7 smd paste+0 mask+0.05: 1(-1.5,1.7) 2(-0.5,1.7) 3(0.5,1.7) 4(1.5,1.7)
  rect 1.2x2.5 smd paste+0 mask+0.05: 5(2.6,-1.7) 6(-2.6,-1.7)
  silkscreen extent -3.18,-2.7 3.18,2.21
PM1.00-1-8PY [mm] "CONN-SMD_A1002WR-S-8P"
  rect 0.6x1.55 smd: 1(-3.5,1.924) 2(-2.5,1.924) 3(-1.5,1.922) 4(-0.5,1.924) 5(0.5,1.924) 6(1.5,1.924) 7(2.5,1.924) 8(3.5,1.924)
  rect 1.2x1.8 smd: 9(4.8,-1.924) 10(-4.8,-1.924)
  silkscreen extent -5,-2.7 5,2.23
STM32H743VIT6 [mm] "LQFP-100_L14.0-W14.0-P0.50-LS16.0-BL"
  oval 0.3x1.6 smd paste+0.051: 1(-6,-7.55) 2(-5.5,-7.55) 3(-5,-7.55) 4(-4.5,-7.55) 5(-4,-7.55) 6(-3.5,-7.55) 7(-3,-7.55) 8(-2.5,-7.55) 9(-2,-7.55) 10(-1.5,-7.55) 11(-1,-7.55) 12(-0.5,-7.55) 13(0,-7.55) 14(0.5,-7.55) 15(1,-7.55) 16(1.5,-7.55) 17(2,-7.55) 18(2.5,-7.55) 19(3,-7.55) 20(3.5,-7.55) 21(4,-7.55) 22(4.5,-7.55) 23(5,-7.55) 24(5.5,-7.55) 25(6,-7.55) 51(6,7.55) 52(5.5,7.55) 53(5,7.55) 54(4.5,7.55) 55(4,7.55) 56(3.5,7.55) 57(3,7.55) 58(2.5,7.55) 59(2,7.55) 60(1.5,7.55) 61(1,7.55) 62(0.5,7.55) 63(0,7.55) 64(-0.5,7.55) 65(-1,7.55) 66(-1.5,7.55) 67(-2,7.55) 68(-2.5,7.55) 69(-3,7.55) 70(-3.5,7.55) 71(-4,7.55) 72(-4.5,7.55) 73(-5,7.55) 74(-5.5,7.55) 75(-6,7.55)
  oval 1.6x0.3 smd paste+0.051: 26(7.55,-6) 27(7.55,-5.5) 28(7.55,-5) 29(7.55,-4.5) 30(7.55,-4) 31(7.55,-3.5) 32(7.55,-3) 33(7.55,-2.5) 34(7.55,-2) 35(7.55,-1.5) 36(7.55,-1) 37(7.55,-0.5) 38(7.55,0) 39(7.55,0.5) 40(7.55,1) 41(7.55,1.5) 42(7.55,2) 43(7.55,2.5) 44(7.55,3) 45(7.55,3.5) 46(7.55,4) 47(7.55,4.5) 48(7.55,5) 49(7.55,5.5) 50(7.55,6) 76(-7.55,6) 77(-7.55,5.5) 78(-7.55,5) 79(-7.55,4.5) 80(-7.55,4) 81(-7.55,3.5) 82(-7.55,3) 83(-7.55,2.5) 84(-7.55,2) 85(-7.55,1.5) 86(-7.55,1) 87(-7.55,0.5) 88(-7.55,0) 89(-7.55,-0.5) 90(-7.55,-1) 91(-7.55,-1.5) 92(-7.55,-2) 93(-7.55,-2.5) 94(-7.55,-3) 95(-7.55,-3.5) 96(-7.55,-4) 97(-7.55,-4.5) 98(-7.55,-5) 99(-7.55,-5.5) 100(-7.55,-6)
  silkscreen extent -7.03,-8 6.25,6.25
TF [mm] "TF-SMD_TF-02"
  rect 0.7x1.6 smd paste+0.051: 1(2.245,5.3) 2(1.145,5.3) 3(0.046,5.3) 4(-1.054,5.3) 5(-2.154,5.3) 6(-3.255,5.3) 7(-4.354,5.3) 8(-5.454,5.3) 9(-6.554,5.3)
  rect 1.2x1.5 smd paste+0.051: 10(-7.754,4.3)
  rect 1.2x2.2 smd paste+0.051: 11(-7.746,-5.3) 12(7.754,-5.3)
  rect 1.6x1.5 smd paste+0.051: 13(6.854,4.3)
  Keep-Out Layer circle w0.003: c-4.946,-5.7 r0.5
  Keep-Out Layer circle w0.003: c3.054,-5.7 r0.5
  Keep-Out Layer region: -4.446,-5.7 -4.446,-5.799 -4.522,-5.983 -4.663,-6.124 -4.847,-6.2 -5.045,-6.2 -5.229,-6.124 -5.37,-5.983 -5.446,-5.799 -5.446,-5.7 -5.446,-5.601 -5.37,-5.417 -5.229,-5.276 -5.045,-5.2 -4.847,-5.2 -4.663,-5.276 -4.522,-5.417 -4.446,-5.601 -4.446,-5.7 -4.446,-5.7
  Keep-Out Layer region: -4.446,-5.7 -4.446,-5.799 -4.522,-5.983 -4.663,-6.124 -4.847,-6.2 -5.045,-6.2 -5.229,-6.124 -5.37,-5.983 -5.446,-5.799 -5.446,-5.7 -5.446,-5.601 -5.37,-5.417 -5.229,-5.276 -5.045,-5.2 -4.847,-5.2 -4.663,-5.276 -4.522,-5.417 -4.446,-5.601 -4.446,-5.7 -4.446,-5.7
  Keep-Out Layer region: 3.554,-5.7 3.554,-5.799 3.478,-5.983 3.337,-6.124 3.153,-6.2 2.955,-6.2 2.771,-6.124 2.63,-5.983 2.554,-5.799 2.554,-5.7 2.554,-5.601 2.63,-5.417 2.771,-5.276 2.955,-5.2 3.153,-5.2 3.337,-5.276 3.478,-5.417 3.554,-5.601 3.554,-5.7 3.554,-5.7
  Keep-Out Layer region: 3.554,-5.7 3.554,-5.799 3.478,-5.983 3.337,-6.124 3.153,-6.2 2.955,-6.2 2.771,-6.124 2.63,-5.983 2.554,-5.799 2.554,-5.7 2.554,-5.601 2.63,-5.417 2.771,-5.276 2.955,-5.2 3.153,-5.2 3.337,-5.276 3.478,-5.417 3.554,-5.601 3.554,-5.7 3.554,-5.7
  silkscreen extent -7.41,-9.68 7.39,4.93
TPS563201DDCR [mm]
  rect 1.1x0.6 smd paste+0 mask+0.051: 1(1.35,-0.95) 2(1.35,0) 3(1.35,0.95) 4(-1.35,0.95) 5(-1.35,0) 6(-1.35,-0.95)
  silkscreen extent -0.9,-1.78 1.52,1.55
XH2.50_2PIN-CZ [mm]
  rect 2x2 hole 1.2: 1(-1.27,0)
  round 2 hole 1.2: 2(1.27,0)
  silkscreen extent -2.54,-1.27 2.54,1.27
YXC_HS_25M_3225 [mm]
  rect 1.4x1.2 smd paste+0.051: 1(-1.1,-0.875) 2(1.1,-0.875) 3(1.1,0.875) 4(-1.1,0.875)
  silkscreen extent -2.29,-1.9 2.07,1.72
YXC_NS_25M_3225 [mm] "CRYSTAL-SMD_4P-L3.2-W2.5-BL"
  rect 1.4x1.2 smd paste+0.051: 1(-1.1,-0.85) 2(1.1,-0.85) 3(1.1,0.85) 4(-1.1,0.85)
  silkscreen extent -2.26,-1.91 2.03,1.68

## Part data
C1 C2 C3 C4 C5 C6 C7 C8 C9 C10 C11 C12 C13 C14 C15 C16 C17 C18 C19 C20 C21 C22 C23 C24 C25 C26 C27 C28 C29 C30 C31 C32 C33 C34 C35 C36 C37 C38 C39 C40 C41 C42 C43 C44 C45 C46 C47 C48 C49 C50 C51 C52: library part 0402-Cap, Symbol=CGA0402X5R106M6R3GT
CARD1: "TF-01A_C2889258", Symbol=TF-01A_C2889258
D1 D2: "二极管配置:独立式;整流电流:150mA;直流反向耐压(Vr):100V;正向压降(Vf):1.25V@150mA;反向恢复时间(Trr):4ns;", Current - Rectified=150mA, JLCPCB Part Class="Extended Part", LCSC Part Name="100V 150mA", Manufacturer=R+O(宏嘉诚), Non-Repetitive Peak Forward Surge Current=2A, Operating Junction Temperature Range=-55℃~+150℃, Pd - Power Dissipation=400mW, Reverse Leakage Current (Ir)=1uA@75V, Voltage - DC Reverse(Vr)=100V, Voltage - Forward(Vf@If)=1.25V@150mA, AddInBom=yes, ConvertToPcb=yes, Datasheet=https://item.szlcsc.com/datasheet/1N4148W/8397140.html, Diode Configuration=独立式, FootprintName=SOD-123_L2.7-W1.6-LS3.7-FD, ManufacturerPart=1N4148W, ModelId=5054d9b7be8b429dad093a54b517b4dd, ModelName=SOD-123_L2.7-W1.6-LS3.7-FD, ModelTransform=145.669,61.024,0,0,0,0,0,0,0, Reverse Recovery Time (trr)=4ns, Supplier=LCSC, Supplier Footprint=SOD-123, SupplierPart=C7420318, Symbol=1N4148W_C7420318
D3: "二极管配置:独立式;正向压降(Vf):600mV@1.0A;直流反向耐压(Vr):40V;整流电流:1A;", Current - Rectified=1A, JLCPCB Part Class="Extended Part", LCSC Part Name="电压:40V 电流:1A", Manufacturer=R+O(宏嘉诚), Non-Repetitive Peak Forward Surge Current=10A, Operating Junction Temperature Range=-55℃~+150℃, Reverse Leakage Current (Ir)=1mA@40V, Voltage - DC Reverse(Vr)=40V, Voltage - Forward(Vf@If)=600mV@1.0A, AddInBom=yes, ConvertToPcb=yes, Datasheet=https://item.szlcsc.com/datasheet/B5819WS/8397153.html, Diode Configuration=独立式, FootprintName=SOD-323_L1.7-W1.3-LS2.5-FD, ManufacturerPart=B5819WS, ModelId=0f2f330c645944df9245ac3c3fec3456, ModelName=SOD-323_L1.7-W1.3-LS2.5-FD, ModelTransform=98.425,49.2125,0,180,0,0,0,0,0, Supplier=LCSC, Supplier Footprint=SOD-323, SupplierPart=C7420331, Symbol=B5819WS_C7420331
J1: "插针结构:1x2P;间距:2.54mm;行距:-;圆针/方针:方针;安装方式:直插;排数:单排;总PIN位数:2P;额定电流:3A;额定电压:-;配合针长度:6mm;塑高:2.5mm;端接针长度:3mm;触头材质:黄铜;触头镀层:金;工作温度:-40℃~+105℃;颜色:黑色;", Color=黑色, Current Rating=3A, JLCPCB Part Class="Extended Part", LCSC Part Name="1x2P 间距:2.54mm 方针 直插", Manufacturer=Megastar(兆星), ManufacturerPart=ZX-PZ2.54-1-2PZZ, Operating Temperature=-40℃~+105℃, Voltage Rating (Max)=-, AddInBom=yes, Circluar Pins/Square Pins=方针, Contact Material=黄铜, Contact Plating=金, ConvertToPcb=yes, Datasheet=https://item.szlcsc.com/datasheet/ZX-PZ2.54-1-2PZZ/8582473.html, FootprintName=HDR-TH_2P-P2.54-V-M, Insulation Height=2.5mm, Length of End Connection Pin=3mm, Length of Mating Pin=6mm, ModelId=e35305ec3aa84b66b849f914b715e73f, ModelName=HDR2.54-M-LI-1X2P, ModelTransform=200,100,0,0,0,0,0,0,-118.11, Mounting Type=直插, Number of Pins=2P, Number of Rows=单排, Pin Structure=1x2P, Pitch=2.54mm, Row Spacing=-, Supplier=LCSC, Supplier Footprint=插件,P=2.54mm, SupplierPart=C7501260, Symbol=ZX-PZ2.54-1-2PZZ
J2: "插针结构:1x8P;间距:1mm;安装方式:卧贴;参考系列:SH;总PIN数:8P;排数:1;每排PIN数:8;行距:-;额定电流:1A;触头材质:磷铜;触头镀层:锡;工作温度:-40℃~+105℃;", Color=-, Current Rating=1A, Flame Retardant Rating=UL94V-0, JLCPCB Part Class="Extended Part", LCSC Part Name="1x8P 间距:1mm 卧贴 系列:SH", Manufacturer=CJT(长江连接器), ManufacturerPart=A1002WR-S-8P-LCP, Operating Temperature=-40℃~+105℃, Voltage Rating=50V, AddInBom=yes, Contact Material=磷铜, Contact Plating=锡, ConvertToPcb=yes, Datasheet=https://item.szlcsc.com/datasheet/A1002WR-S-8P-LCP/238630.html, FootprintName=CONN-SMD_A1002WR-S-8P, ModelId=4a02b27f0fd74216a2a7cf264e5e8a60, ModelName=CONN-SMD_SH1.00-WS-8P, ModelTransform=374.015,196.85,0,0,0,0,0,-6.693,0, Mounting Type=卧贴, Number of Pins=8P, Number of PINs Per Row=8, Number of Rows=1, Pins Structure=1x8P, Pitch=1mm, Plastic Material=LCP, Reference Series=SH, Row Spacing=-, Supplier=LCSC, Supplier Footprint=SMD,P=1mm,卧贴, SupplierPart=C239526, Symbol=A1002WR-S-8P
J3 J4: library part PM1.00-1-3PY, "插针结构:1x3P;间距:1mm;安装方式:卧贴;参考系列:SH;总PIN数:3P;排数:1;每排PIN数:3;行距:-;额定电流:1A;触头材质:黄铜;触头镀层:锡;工作温度:-40℃~+85℃;", Color=米色, Current Rating=1A, Flame Retardant Rating=-, JLCPCB Part Class="Extended Part", LCSC Part Name="1x3P 间距:1mm 卧贴 系列:SH", Manufacturer=Megastar(兆星), ManufacturerPart=ZX-SH1.0-3PWT, Operating Temperature=-40℃~+85℃, Voltage Rating=50V, AddInBom=yes, Contact Material=黄铜, Contact Plating=锡, ConvertToPcb=yes, Datasheet=https://item.szlcsc.com/datasheet/ZX-SH1.0-3PWT/8430314.html, FootprintName=CONN-SMD_3P-P1.00_MEGASTAR_ZX-SH1.0-3PWT, ModelId=1278262bd4cd435b96f1008df75d115e, ModelName=CONN-SMD_3P-P1.00_MEGASTAR_ZX-SH1.0-3PWT, ModelTransform=211.0232,198.8185,0,0,0,0,0.118,-7.874,0, Mounting Type=卧贴, Number of Pins=3P, Number of PINs Per Row=3, Number of Rows=1, Pins Structure=1x3P, Pitch=1mm, Plastic Material=LCP, Reference Series=SH, Row Spacing=-, Supplementary Features=辅助焊脚, Supplier=LCSC, Supplier Footprint=SMD,P=1mm,卧贴, SupplierPart=C7430445, Symbol=ZX-SH1.0-3PWT, X-Length of Bottom Edge on Board (Spacing Line)=5.35mm, Y-Width of Bottom Edge on Board=4.3mm, Z-Height of the Board=3.15mm
J5: "插针结构:1x4P;间距:1mm;安装方式:卧贴;参考系列:SH;总PIN数:4P;排数:1;每排PIN数:4;行距:-;额定电流:1A;触头材质:黄铜;触头镀层:锡;工作温度:-40℃~+85℃;", Color=米色, Current Rating=1A, Flame Retardant Rating=-, JLCPCB Part Class="Extended Part", LCSC Part Name="1x4P 间距:1mm 卧贴 系列:SH", Manufacturer=Megastar(兆星), ManufacturerPart=ZX-SH1.0-4PWT, Operating Temperature=-40℃~+85℃, Voltage Rating=50V, AddInBom=yes, Contact Material=黄铜, Contact Plating=锡, ConvertToPcb=yes, Datasheet=https://item.szlcsc.com/datasheet/ZX-SH1.0-4PWT/8430315.html, FootprintName=CONN-SMD_4P-P1.00_MEGASTAR_ZX-SH1.0-4PWT, ModelId=12775bf286e24184ade05a2f5a42ab9d, ModelName=CONN-SMD_4P-P1.00_MEGASTAR_ZX-SH1.0-4PWT, ModelTransform=250.393,198.8185,0,0,0,0,0.2,-7.877,0, Mounting Type=卧贴, Number of Pins=4P, Number of PINs Per Row=4, Number of Rows=1, Pins Structure=1x4P, Pitch=1mm, Plastic Material=LCP, Reference Series=SH, Row Spacing=-, Supplementary Features=辅助焊脚, Supplier=LCSC, Supplier Footprint=SMD,P=1mm,卧贴, SupplierPart=C7430446, Symbol=ZX-SH1.0-4PWT, X-Length of Bottom Edge on Board (Spacing Line)=6.35mm, Y-Width of Bottom Edge on Board=4.3mm, Z-Height of the Board=3.15mm
L1: library part 2512-IND, "电感值:3.3uH;精度:±20%;额定电流:1.5A;饱和电流(Isat):1.7A;类型:磁胶屏蔽电感;", Current - Saturation(Isat)=1.7A, Current Rating=1.5A, DC Resistance(DCR)=215mΩ, JLCPCB Part Class="Extended Part", LCSC Part Name="3.3uH ±20% 1.7A", Manufacturer=YJYCOIN(益嘉源), ManufacturerPart=YHNR2512-3R3M, Tolerance=±20%, AddInBom=yes, ConvertToPcb=yes, Datasheet=https://item.szlcsc.com/datasheet/YHNR2512-3R3M/19355334.html, FootprintName=IND-SMD_L2.5-W2.0_YHNR2512, ModelId=a4637a51cdac46ea8dbfd73cca5b141e, ModelName=IND-SMD_L2.5-W2.0_YHNR2512, ModelTransform=78.74,98.425,0,90,0,0,0,0,0, Supplier=LCSC, Supplier Footprint=1005, SupplierPart=C18199419, SymbolName=YHNR2512-3R3M, Type=磁胶屏蔽电感
LED1: "灯头类型:-;发光颜色:蓝色;正向压降(Vf):2.6V~3.1V;功率:-;测试电流:5mA;波长:460nm~475nm;二极管配置:独立二极管;透镜颜色:无色透明透镜;色温:-;发光强度:34mcd~100mcd;发光角度:120°;载带方式:正贴;工作温度:-40℃~+85℃;", Color Temperature=-, Illumination Color=蓝色, JLCPCB Part Class="Extended Part", LCSC Part Name="0402 蓝灯 高亮", Lens Color=无色透明透镜, Manufacturer="Guiguang light(桂光光电)", ManufacturerPart=GL0402UB01, Operating Temperature=-40℃~+85℃, Test Current=5mA, Voltage - Forward(Vf)=2.6V~3.1V, AddInBom=yes, ConvertToPcb=yes, Datasheet=https://item.szlcsc.com/datasheet/GL0402UB01/54645999.html, Diode Configuration=独立二极管, FootprintName=LED0402-R-RD, Lamp Holder Type=-, Luminous Intensity=34mcd~100mcd, ModelId=b7ca3c30c6b4443191a5849952e50378, ModelName=LED0402_L1.0-W0.5-H0.4, ModelTransform=40.1574,19.685,0,0,0,0,0,0,0, Mounting Style=正贴, Peak Wavelength=-, Power(Watts)=-, Supplier=LCSC, Supplier Footprint=0402, SupplierPart=C51933303, Symbol=GL0402UB01, Viewing Angle=120°, Wavelength - Dominant=460nm~475nm
LED2: "灯头类型:-;发光颜色:翠绿色;正向压降(Vf):2.6V~3.1V;功率:-;测试电流:5mA;波长:513nm~528nm;二极管配置:独立二极管;透镜颜色:无色透明透镜;色温:-;发光强度:175mcd~430mcd;发光角度:120°;载带方式:正贴;工作温度:-40℃~+85℃;", Color Temperature=-, Illumination Color=翠绿色, JLCPCB Part Class="Extended Part", LCSC Part Name="0402 翠绿 高亮", Lens Color=无色透明透镜, Manufacturer="Guiguang light(桂光光电)", ManufacturerPart=GL0402UG01, Operating Temperature=-40℃~+85℃, Test Current=5mA, Voltage - Forward(Vf)=2.6V~3.1V, AddInBom=yes, ConvertToPcb=yes, Datasheet=https://item.szlcsc.com/datasheet/GL0402UG01/54645998.html, Diode Configuration=独立二极管, FootprintName=LED0402-RD, Lamp Holder Type=-, Luminous Intensity=175mcd~430mcd, ModelId=080bb9bd520f4b34ac21e218e7b036d6, ModelName=LED0402_L1.0-W0.5-H0.2, ModelTransform=40.1574,19.685,0,0,0,0,0,-0.0005,0, Mounting Style=正贴, Peak Wavelength=-, Power(Watts)=-, Supplier=LCSC, Supplier Footprint=0402, SupplierPart=C51933302, Symbol=GL0402UG01, Viewing Angle=120°, Wavelength - Dominant=513nm~528nm
LED3: "灯头类型:1.1mmx0.5mm方形灯头;发光颜色:红色;正向压降(Vf):1.8V~2.4V;功率:-;测试电流:20mA;波长:615nm~630nm;二极管配置:独立二极管;透镜颜色:无色透明透镜;色温:-;发光强度:85mcd~210mcd;发光角度:120°;载带方式:正贴;工作温度:-40℃~+85℃;", Color Temperature=-, Illumination Color=红色, JLCPCB Part Class="Extended Part", LCSC Part Name="0402 红灯 高亮", Lens Color=无色透明透镜, Manufacturer="Guiguang light(桂光光电)", ManufacturerPart=GL0402UR01, Operating Temperature=-40℃~+85℃, Test Current=20mA, Voltage - Forward(Vf)=1.8V~2.4V, AddInBom=yes, ConvertToPcb=yes, Datasheet=https://item.szlcsc.com/datasheet/GL0402UR01/54645997.html, Diode Configuration=独立二极管, FootprintName=LED0402-RD, Lamp Holder Type=1.1mmx0.5mm方形灯头, Luminous Intensity=85mcd~210mcd, ModelId=080bb9bd520f4b34ac21e218e7b036d6, ModelName=LED0402_L1.0-W0.5-H0.2, ModelTransform=40.1574,19.685,0,0,0,0,0,-0.0005,0, Mounting Style=正贴, Peak Wavelength=-, Power(Watts)=-, Supplier=LCSC, Supplier Footprint=0402, SupplierPart=C51933301, Symbol=GL0402UR01, Viewing Angle=120°, Wavelength - Dominant=615nm~630nm
OSC1: "YXC_HS_25M_3225", Symbol=OT2EL4C4JI-111OLP-25M
P1 P2 P3 P4: "插针结构:1x2P;间距:1mm;安装方式:卧贴;参考系列:SH;总PIN数:2P;排数:1;每排PIN数:2;行距:-;额定电流:1A;触头材质:黄铜;触头镀层:锡;工作温度:-40℃~+85℃;", Color=米色, Current Rating=1A, Flame Retardant Rating=-, JLCPCB Part Class="Extended Part", LCSC Part Name="1x2P 间距:1mm 卧贴 系列:SH", Manufacturer=Megastar(兆星), ManufacturerPart=ZX-SH1.0-2PWT, Operating Temperature=-40℃~+85℃, Voltage Rating=50V, AddInBom=yes, Contact Material=黄铜, Contact Plating=锡, ConvertToPcb=yes, Datasheet=https://item.szlcsc.com/datasheet/ZX-SH1.0-2PWT/8430313.html, FootprintName=CONN-SMD_2P-P1.00_HX-1.0-2P-WT, ModelId=ba479b8c33e5452cbb41f1de8b72e1b9, ModelName=CONN-SMD_2P-P1.00_HX-1.0-2P-WT, ModelTransform=157.48,204.724,0,0,0,0,-0.005,-14.214,0, Mounting Type=卧贴, Number of Pins=2P, Number of PINs Per Row=2, Number of Rows=1, Pins Structure=1x2P, Pitch=1mm, Plastic Material=LCP, Reference Series=SH, Row Spacing=-, Supplementary Features=辅助焊脚, Supplier=LCSC, Supplier Footprint=SMD,P=1mm,卧贴, SupplierPart=C7430444, Symbol=ZX-SH1.0-2PWT, X-Length of Bottom Edge on Board (Spacing Line)=4.35mm, Y-Width of Bottom Edge on Board=4.3mm, Z-Height of the Board=3.15mm
Q1: "数量:1个P沟道;漏源电压(Vdss):30V;连续漏极电流(Id):4.2A;导通电阻(RDS(on)):55mΩ@10V;耗散功率(Pd):1.2W;阈值电压(Vgs(th)):1.3V;", Current - Continuous Drain(Id)=4.2A, Drain to Source Voltage=30V, Gate Threshold Voltage (Vgs(th))=1.3V, Input Capacitance(Ciss)=950pF, JLCPCB Part Class="Extended Part", LCSC Part Name="1个P沟道 耐压:30V 电流:4.2A", Manufacturer=BL(上海贝岭), Operating Temperature=-, Output Capacitance(Coss)=115pF, Pd - Power Dissipation=1.2W, Reverse Transfer Capacitance (Crss@Vds)=75pF, AddInBom=yes, Configuration=-, ConvertToPcb=yes, Datasheet=https://item.szlcsc.com/datasheet/BLM3401/91666.html, FootprintName=SOT-23-3_L2.9-W1.6-P1.90-LS2.8-BR, Gate Charge(Qg)=9.5nC@4.5V, ManufacturerPart=BLM3401, ModelId=89cb27a44ab2466697082bb9fd73a7d0, ModelName=SOT-23-3L_L2.9-W1.6-H1.1-LS2.8-P0.95, ModelTransform=114.173,110.236,0,90,0,0,0,0,0, Number=1个P沟道, RDS(on)=55mΩ@10V, Supplier=LCSC, Supplier Footprint=SOT-23, SupplierPart=C90479, Symbol=BLM3401, Type=P沟道, Vgs=±20V
Q2: "数量:1个N沟道;漏源电压(Vdss):60V;连续漏极电流(Id):300mA;导通电阻(RDS(on)):5Ω@10V;耗散功率(Pd):830mW;阈值电压(Vgs(th)):2.5V;", Current - Continuous Drain(Id)=300mA, Drain to Source Voltage=60V, Gate Threshold Voltage (Vgs(th))=2.5V, Input Capacitance(Ciss)=50pF, JLCPCB Part Class="Extended Part", LCSC Part Name="1个N沟道 耐压:60V 电流:300mA", Manufacturer=Nexperia(安世), ManufacturerPart=2N7002,215, Operating Temperature=-65℃~+150℃, Output Capacitance(Coss)=6.8pF, Pd - Power Dissipation=830mW, Reverse Transfer Capacitance (Crss@Vds)=3.5pF, AddInBom=yes, Configuration=-, ConvertToPcb=yes, Datasheet=https://item.szlcsc.com/datasheet/2N7002%252C215/66260.html, FootprintName=SOT-23_L2.9-W1.3-P1.90-LS2.4-BR, Gate Charge(Qg)=-, ModelId=c62791f0466c4ae2a892c056b845b0ca, ModelName=SOT-23-3P_L2.9-W1.3-H1.0-LS2.4-P0.95, ModelTransform=98.64468,114.173,0,180,0,0,0.001,-0.002,0, Number=1个N沟道, RDS(on)=5Ω@10V, Supplier=LCSC, Supplier Footprint=SOT-23, SupplierPart=C65189, Symbol=2N7002,215, Type=N沟道, Vgs=±30V
R1 R2 R3 R4 R5 R6 R7 R8 R9 R10 R11 R12 R13 R14 R15 R16 R17 R18 R19 R20 R21 R22 R23 R24 R25 R26 R27 R28 R29 R30 R31 R32 R33 R34 R35 R36 R37 R38: library part 0402-Res, Symbol=0402WGF1002TCE
SW1: "电路结构:单刀单掷;按钮形状:方形按钮;作用力:1.6N;安装方式:卧贴;开关长度:5.55mm;开关宽度:1.1mm;开关高度:4mm;带支架:不带支架;触点电流:50mA;额定电压:12V;带灯:无;工作寿命:3万次;", Actuator/Cap Color=白色, Contact Current=50mA, IP Rating=-, JLCPCB Part Class="Extended Part", LCSC Part Name="侧按小贝贝2*4 沉板式3.5mmx4.0mm 160gf", Manufacturer=hanxia(韩下), ManufacturerPart="HX TS24CB 160gf", Operating Force=1.6N, Operating Temperature=-25℃~+70℃, Voltage Rating=12V, Actuator Style=方形按钮, AddInBom=yes, Circuit=单刀单掷, ConvertToPcb=yes, Datasheet=https://item.szlcsc.com/datasheet/HX%2520TS24CB%2520160gf/26898574.html, FootprintName=SW-SMD_HX-TS24CB-160GF, Length=5.55mm, Life=3万次, ModelId=f4d7273b903e43c4b88f6833b850897a, ModelName=SW-SMD_HX-TS24CB-160GF, ModelTransform=218.5035,159.842,0,0,0,0,0,27.205,-39.37, Mounting Type=卧贴, Supplier=LCSC, Supplier Footprint=SMD,5.6x2mm, SupplierPart=C25168832, Switch Height=4mm, Symbol="HX TS24CB 160GF", Termination Style=SMD接片, Width=1.1mm, with Bracket=不带支架, With Lamp=无
U2: "功能类型:降压型;工作电压:4.5V~17V;输出电压:768mV~7V;输出电流:3A;输出类型:可调;", Frequency - Switching=580kHz, JLCPCB Part Class="Extended Part", LCSC Part Name="降压型 3A 4.5V~17V", Manufacturer=TI(德州仪器), Operating Temperature=-40℃~+125℃@(TJ), Output Current=3A, Output Voltage=768mV~7V, Quiescent Current=380uA, Voltage - Supply=4.5V~17V, AddInBom=yes, ConvertToPcb=yes, Datasheet=https://www.ti.com/cn/lit/ds/symlink/tps563201.pdf, Features=轻载高效模式；逐波限流；过流保护；打嗝限流, FootprintName=SOT-23-6_L2.9-W1.6-P0.95-LS2.8-BR, Function=降压型, ManufacturerPart=TPS563201DDCR, ModelId=18da8f6c14a34920b3e136b5c401a119, ModelName=SOT-23-6_L2.9-W1.6-H1.5-LS2.8-P0.95, ModelTransform=110.73671,114.173,0,180,0,0,0.001,-0.003,0, Number of Outputs=1, Output Type=可调, Supplier=LCSC, Supplier Footprint=SOT-23-THIN-6, SupplierPart=C116592, Switch tube (built-in/external)=内置, Symbol=TPS563201DDCR, Synchronous Rectifier=是, Topology=降压式
U3: "输出极性:正极;工作电压:15V;输出电压:3.3V;输出电流:1A;电源纹波抑制比(PSRR):-;输出类型:固定;", JLCPCB Part Class="Extended Part", LCSC Part Name="3.3V 1A 15V", Manufacturer=MSKSEMI(美森科), ManufacturerPart=AMS1117-3.3V, Operating Temperature=0℃~+125℃@(Ta), Output Current=1A, Output Voltage=3.3V, Power Supply Rejection Ratio (PSRR)=-, standby current=12mA, Voltage - Supply=15V, AddInBom=yes, ConvertToPcb=yes, Datasheet=https://item.szlcsc.com/datasheet/AMS1117-3.3V/5706251.html, Features=-, FootprintName=SOT-89-3_L4.5-W2.5-P1.50-LS4.2-BR, ModelId=6db690b7897d4d18a30d90c1b89525ee, ModelName=SOT-89-3_L4.3-W2.5-H1.6-LS4.1-P1.50, ModelTransform=161.417,169.291,0,180,0,0,-18.661,0,0, Noise=-, Number of Outputs=1, Output Configuration=正极, Output Type=固定, Supplier=LCSC, Supplier Footprint=SOT-89, SupplierPart=C5120796, Symbol=AMS1117-3.3V_C5120796, Voltage Dropout=-
X1: "2012", Symbol=FC-12M32.768KHZ7PF20PPM
X2: "XL2EL89CSI-111YLC-25M", Symbol=XL2EL89CSI-111YLC-25M
U1: Symbol=STM32H743VIT6_C114409
U4: Symbol=ICM-20689
U5: Symbol=BMI088
U6: Symbol=ICM-20602
U7: Symbol=IST8310_C2683055
U8: Symbol=MS561101BA03-50
U9: Symbol=LAN8720A-CP-TR

## Free pads (board coordinates)
  round 188.98 hole 125.98 unplated: 1(1309.06,1309.06) 2(108.27,1309.06) 3(108.27,108.27) 4(1309.06,108.27)

## Via types
v1: diameter 18, hole 8, L1_TOP to L4_BOTTOM, tented both sides, 97 vias

## Nets (pads, with @x,y where several pads share a name; then routed paths per layer and width w, separated by ;. In a path a pad name is that pad's centre, name@x,y a point inside that pad or via, vN(x,y) a via of type N, cw(c..) or ccw(c..) an arc to the next point about the centre after c; other vN are vias at no path point)
3V3: C4.2 C6.2 C17.1 C18.1 C27.1 C28.2 C30.2 C31.2 C32.2 C34.2 C35.2 C36.2 C37.2 C38.1 C40.1 C41.1 C43.1 C44.2 C47.1 C50.2 CARD1.4 OSC1.1 OSC1.4 R9.2 R10.1 R13.1 R14.1 R18.2 R19.2 R20.2 R21.2 R22.1 R26.1 R27.1 R28.1 R29.1 R33.2 R34.2 R35.2 R36.2 R37.2 R38.2 U3.2 U4.8 U4.13 U5.3 U5.11 U6.1 U6.16 U7.2 U7.13 U8.1 U8.2 U9.1 U9.9 U9.19 | length 3751.5
  L1_TOP w10: U7.13@811.03,1084.13 811.03,1148.34 826.51,1163.82 850.48,1163.82 861.22,1153.08 861.22,1139.96 877.08,1124.1 U7.2@886.42,1124.1
  L1_TOP w12: v1(456.69,589.57) 499.02,547.24 v1(576.77,547.24) ; v1(484.7,1219.72) 503.94,1200.48 503.94,1168.83 504.92,1167.84 504.92,1163.61 R21.2@560.52,1163.61 ; C40.1@522.64,1312.32 v1@568.22,1312.32 ; v1(639.9,1146.52) 675.88,1110.54 688.28,1110.54 692.91,1105.91 C36.2@692.91,1105.4 ; v1(786.42,1250.98) 844.04,1308.61 857.57,1308.61 C30.2@862.2,1313.24 ; C30.2@862.2,1313.67 C30.2@862.2,1313.24 ; U7.2@893.13,1124.02 922.78,1124.02 953.34,1154.58 ; C38.1@953.34,1165.51 953.34,1160.88 953.34,1154.43 982.34,1125.42 982.34,1111.36 R19.2@986.92,1106.78 ; U5.11@958.75,1272.87 877.73,1272.87 862.2,1288.39 C30.2@862.2,1313.24 ; R20.2@986.53,1058.07 986.92,1058.46 987.02,1058.56 1033.96,1058.56 v1(1034.45,1059.06) ; U6.1@1020.96,748.03 1047.1,748.03 1054.13,755.06 U6.16@1054.13,761.52 1054.13,794.06 ; U5.3@1053.23,1312.24 1116.77,1312.24 ; C34.2@1053.67,817.22 1049.04,821.85 C34.2@1048.54,821.85 1054.13,816.26 1054.13,794.06 ; v1(1075.79,794.29) 1073.25,794.29 1073.02,794.06 1054.13,794.06 ; v1(1104.81,1346.67) 1105.95,1345.52 1105.95,1312.99 ; C28.2@1120.62,1312.24 1127.05,1312.24 C28.2@1130.91,1308.38 ; U4.8@1163.39,1016.24 1163.39,1000.57 1181.76,982.2 1181.76,963.91 v1(1182.91,962.76) ; U4.13@1271.66,1045.77 1271.66,1025.58 1280.35,1016.9 1287.24,1016.9 v1(1288.39,1015.75)
  L1_TOP w24: R13.1@61.7,481.3 R14.1@61.7,432.22 61.7,419.21 89.11,391.8 169.74,391.8 192.12,369.42 197.16,364.39 ; OSC1.1@85.63,908.46 OSC1.4@85.63,977.36 83.98,979.01 83.98,1036.99 61.71,1059.25 C4.2@61.71,1129.03 C6.2@116.07,1129.03 ; C18.1@197.16,351.38 197.48,351.06 C17.1@197.48,303.15 256.52,244.11 U3.2@366.04,244.11 428.01,244.11 470,286.1 R18.2@528.35,286.1 ; U8.2@388.78,1342.52 U8.1@437.99,1342.52 492.44,1342.52 C40.1@522.64,1312.32 ; R20.2@986.92,1058.46 R19.2@986.92,1106.78 ; C35.2@1048.54,870.08 1048.43,870.18 1048.43,950.79 C27.1@1096.46,950.79 ; v1(1096.72,918.04) C27.1@1096.72,951.05 ; R10.1@1178.06,319.9 1178.06,341.45 v1(1198.82,362.2) ; R9.2@1222.34,450.06 v1(1222.34,487.2) ; C31.2@1340.55,1099.89 C32.2@1340.55,1032.59 1340.87,1032.28 1375.2,1032.28 v1(1375.98,1031.5)
  L4_BOTTOM w12: v1@113.74,681.54 134.77,681.54 141.8,674.51 141.8,664.93 146.43,660.3 R26.1@146.94,660.3 ; v1(115.16,522.51) R29.1@146.94,522.51 ; v1(115.16,562.99) 116.31,564.14 142.64,564.14 R28.1@146.94,568.44 ; v1(217.52,529.53) 229.33,541.34 U9.19@251.47,541.34 ; v1(259.84,670.28) 260.99,669.13 283.96,669.13 284.45,668.64 U9.1@284.45,665.65 ; U9.9@408.76,600.39 445.87,600.39 v1(456.69,589.57) ; C47.1@513.47,669.29 513.73,669.55 513.73,690.89 521.42,698.59 544.53,698.59 552.44,706.5 R36.2@596.23,706.5 ; R33.2@547.55,575.79 569.74,575.79 576.77,568.76 v1(576.77,547.24) ; v1(553.17,892.86) R38.2@596.74,893.9
  L4_BOTTOM w24: C44.2@142.16,462.39 C43.1@193.34,462.39 ; R28.1@146.94,568.44 R27.1@146.94,614.37 ; C41.1@176.03,755.71 v1(176.03,792.48) ; R34.2@596.74,612.99 R35.2@596.74,659.25 R36.2@596.74,706.5 596.74,755.91 ; R37.2@596.74,845.86 596.74,755.91 ; R37.2@596.74,847.64 R38.2@596.74,893.9 ; CARD1.4@705.24,751.63 C50.2@631.31,751.63 601.02,751.63 596.74,755.91
  other v1: 113.19,682.09 82.68,1036.42 568.9,1312.99
5V: C10.1 C11.1 D3.1 J2.4 J3.2 L1.1 R16.1 | length 1770
  L1_TOP w20: v1(574.4,254.34) D3.1@574.4,222.44 ; v1(574.8,185.04) 574.4,185.44 D3.1@574.4,222.44 ; v1(625,185.04) 625,222.44 ; L1.1@708.66,222.44 689.62,222.44 625,222.44 ; v1(1120.08,358.27) 1121.02,357.33 R16.1@1121.02,319.9 ; J2.4@1206.72,688.99 v1(1264.76,688.98) ; D3.1@574.4,222.44 625,222.44
  L1_TOP w32: C10.1@685.93,286.09 685.93,226.13 L1.1@689.62,222.44 ; L1.1@708.66,222.44 728.11,222.44 731.79,226.13 C11.1@731.79,286.09
  L4_BOTTOM w20: J3.2@708.67,1222.44 708.67,1255.91 736.83,1284.07 823.89,1284.07 835.6,1295.79 835.6,1323.68 872.46,1360.54 918.53,1360.54 989.7,1289.37 1012.94,1289.37 1013.1,1289.21 1172.78,1289.21 1263.33,1198.66 1288.54,1198.66 1315.94,1171.26 1315.94,740.16 v1(1264.76,688.98)
+BAT_3S: J1.1 Q1.2 R8.2 | length 229.9
  L1_TOP w32: R8.2@824.8,167.02 824.8,148.13 869.29,103.65 869.29,102.76 Q1.2@878.55,93.5
  L1_TOP w50: J1.1@758.66,59.06 844.1,59.06 Q1.2@878.55,93.5
BMI088_ACCE_INT: U1.88 U5.16 | length 601.2
  L1_TOP w6: U1.88@629.92,1005.9 629.92,1050.03 623.03,1056.92 623.03,1101.08 633.86,1111.91 v1(633.86,1115.16) ; v1(905.51,1335.63) 905.51,1337.28 936.26,1368.03 U5.16@1005.99,1368.03
  L4_BOTTOM w6: v1(633.86,1115.16) 669.29,1150.59 732.09,1150.59 761.57,1180.07 806.58,1225.08 806.58,1236.7 v1(905.51,1335.63)